# Altium PCB DB46.PcbDoc (part 3 of 6)
Units mm, origin at the board's own origin, x right, y up, seen from the top; angles counter-clockwise.
Board outline 82.2 x 113.2 mm, 8 copper layers (Top Layer, MidLayer1, MidLayer2, GND, MidLayer3, VCC, MidLayer4, Bottom Layer), stack 1.576 mm thick; 186 components, 477 nets, 1727 pads, 1538 vias.
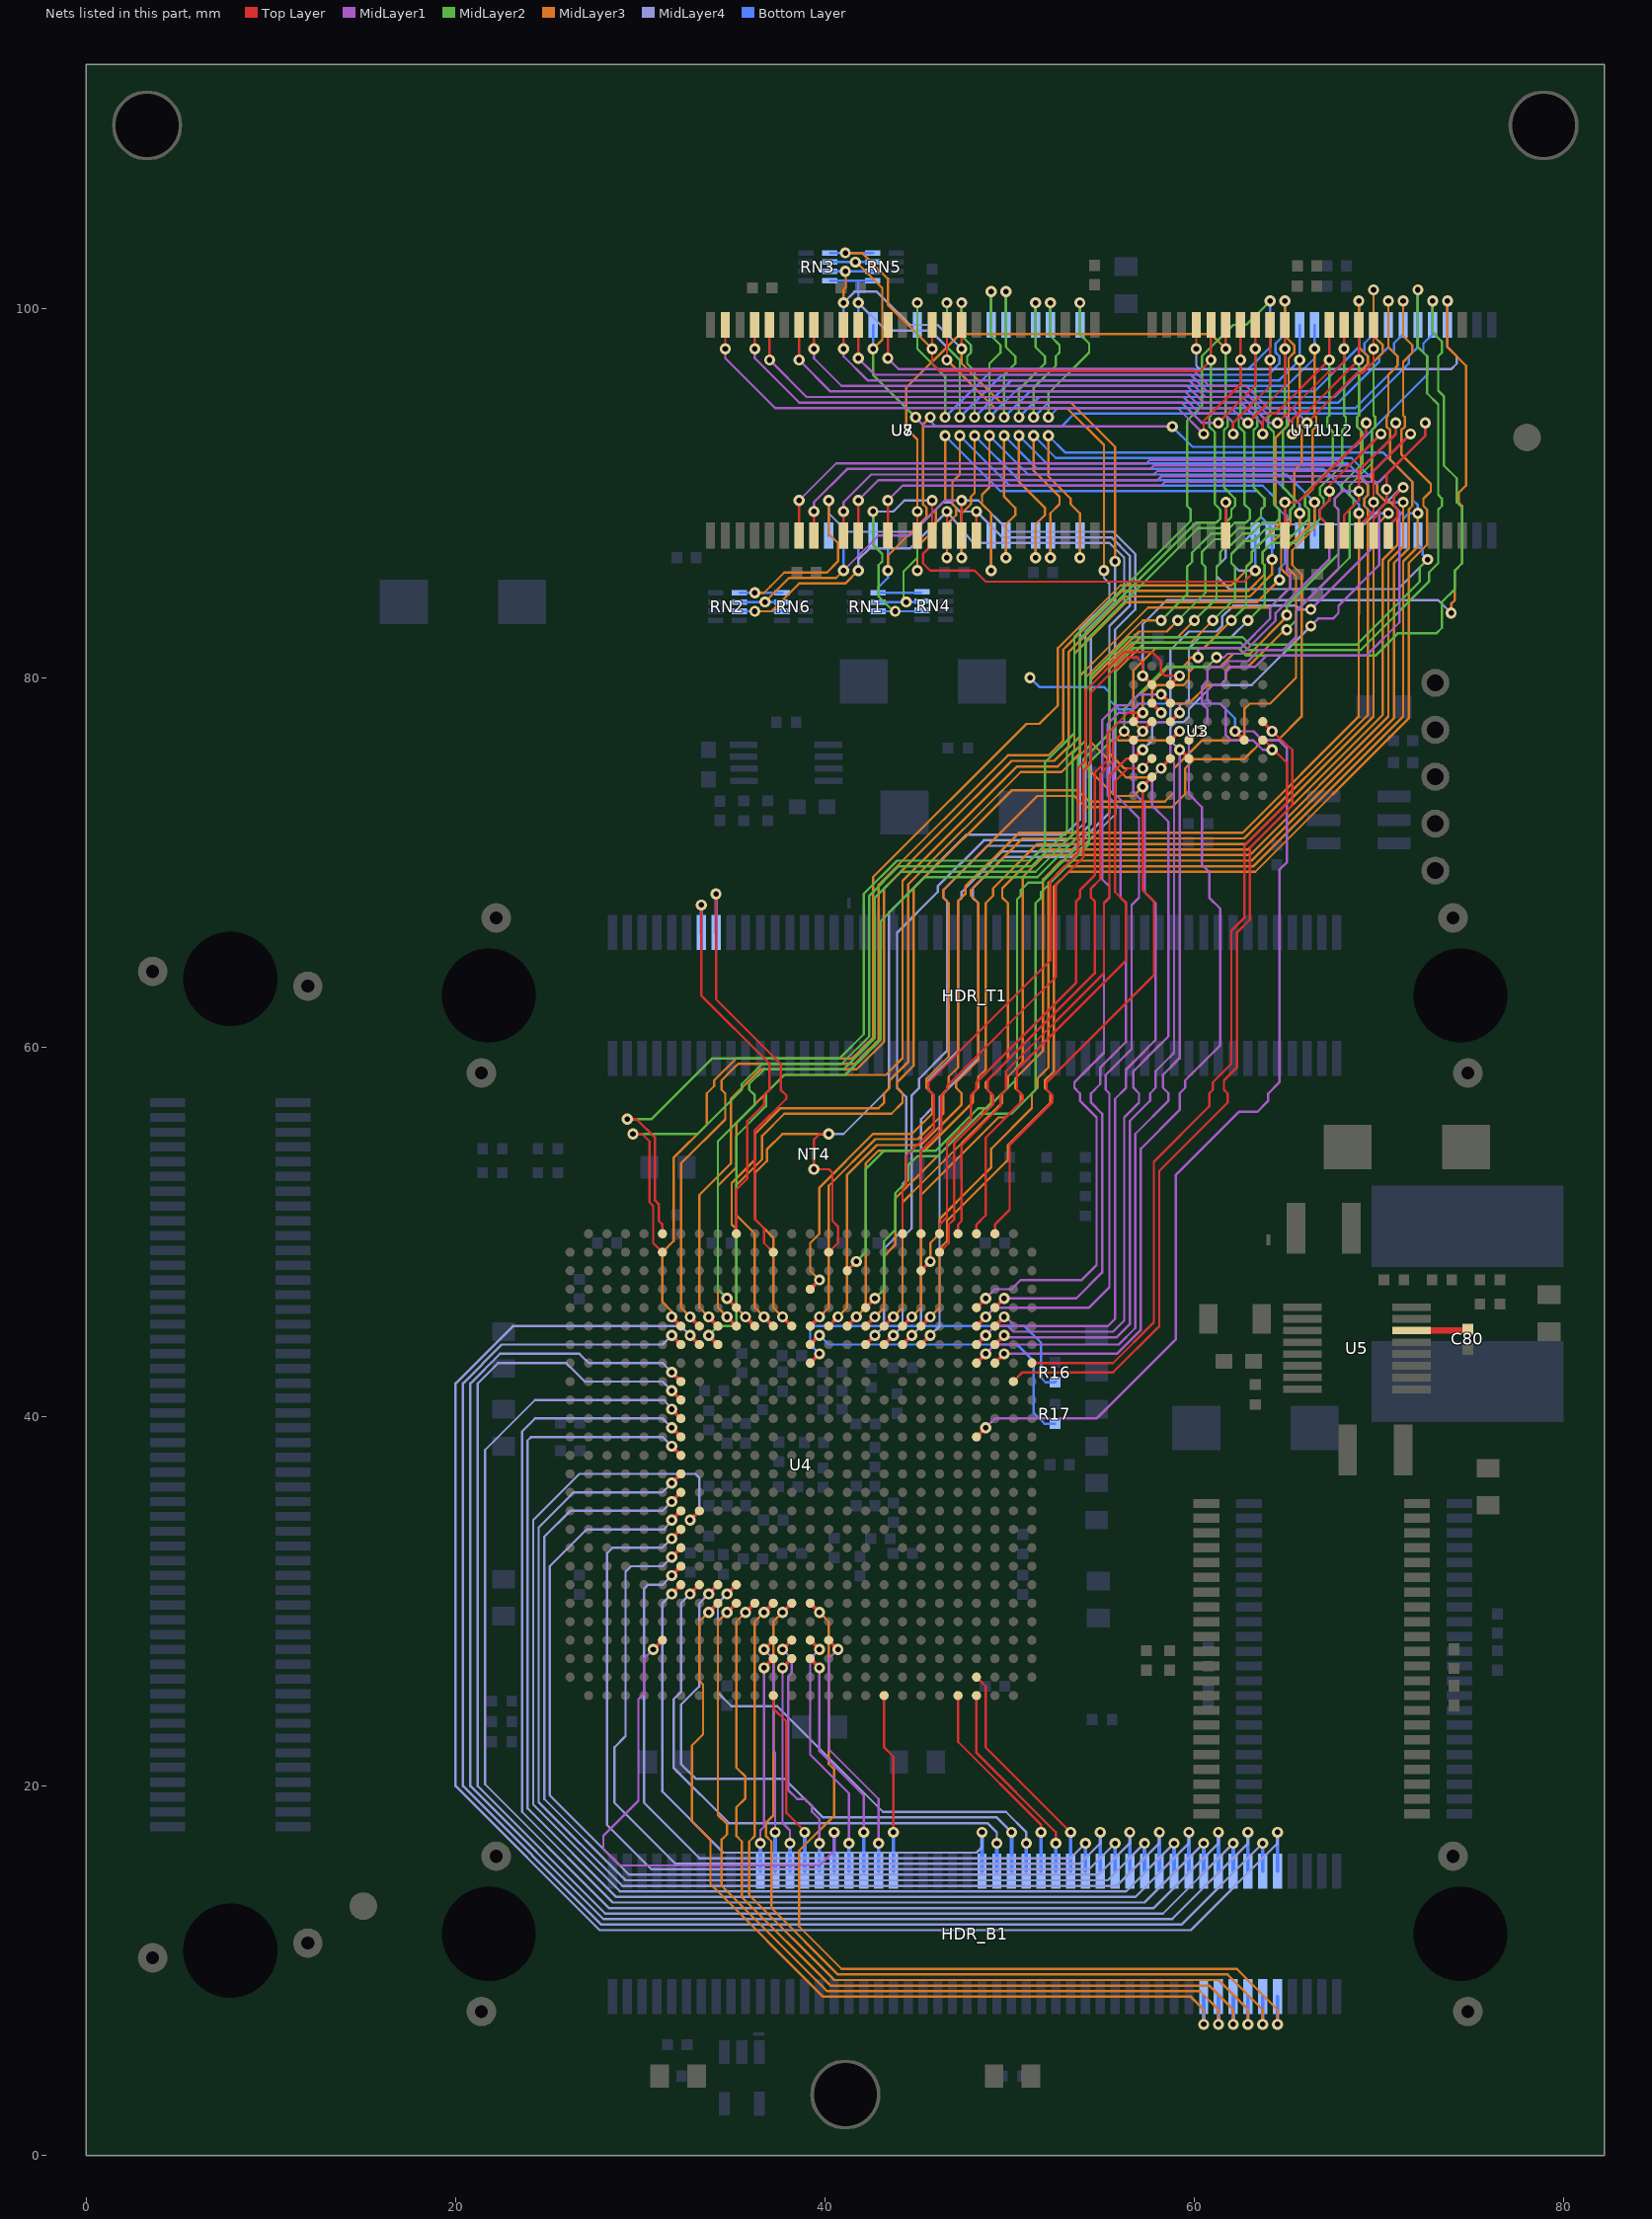
[diagram p9: the nets of this part, all layers, seen from the top]

## Via types
v1: diameter 0.6, hole 0.3, Top Layer to Bottom Layer, 904 vias
v2: diameter 0.6, hole 0.3, Top Layer to Bottom Layer, tented both sides, 506 vias
v3: diameter 0.7, hole 0.4, Top Layer to Bottom Layer, 127 vias
v4: diameter 0.6, hole 0.3, Top Layer to Bottom Layer, tented top, 1 vias

## Nets (pads, with @x,y where several pads share a name; then routed paths per layer and width w, separated by ;. In a path a pad name is that pad's centre, name@x,y a point inside that pad or via, vN(x,y) a via of type N, cw(c..) or ccw(c..) an arc to the next point about the centre after c; other vN are vias at no path point) (continued)
BUS_D3: U3.H4 U4.A21 U7.7 U11.10 | length 93.8
  Top Layer w0.127: U7.7@38.6,87.7 v2(38.6,89.6) ; U4.A21@46.2,49.9 46.2,50.4 46.6,50.8 46.6,51.5 46.6,51.8 46.6,54.8 47.9,56.1 47.9,57.4 48.2,57.7 48.2,58.1 53.6,63.5 53.6,67.9 53.8,68.1 53.8,68.5 54.6,69.3 54.6,74.859 55.3,75.559 55.3,77 56.4,78.1 v1(57.2,78.1) ; U11.10@64.9,87.7 v1(64.9,89.5) 65.6,89.5 69.3,93.2 v2(69.3,93.8)
  Top Layer w0.2: U3.H4@56.7,77.625 v1@57.187,78.112
  MidLayer1 w0.127: v2(38.6,89.6) 40.6,91.6 57.4,91.6 57.6,91.8 67.9,91.8 69.3,93.2 v2(69.3,93.8) ; v1(60.2,81.1) 60.2,81.5 60.3,81.6 62.5,81.6 64.1,83.2 64.1,83.8 65.2,84.9 65.2,85.6 65,85.8 65,88.8 64.9,88.9 v1(64.9,89.5)
  MidLayer3 w0.127: v1(57.2,78.1) 57.2,79.2 57.3,79.3 58.6,80.6 59.4,80.6 59.7,80.9 59.7,81 59.8,81.1 v1(60.2,81.1)
BUS_D4: U3.H5 U4.B21 U7.8 U11.13 | length 94.7
  Top Layer w0.127: U7.8@39.4,87.7 v2(39.4,89) ; U4.B21@46.2,48.9 46.7,49.4 ; 46.7,49.5 46.7,49.4 ; U3.H5@56.7,76.625 v1(56.2,77.1) 55.6,76.5 55.6,75.5 54.9,74.8 54.9,69.1 54.4,68.6 54.4,68.1 54.6,67.9 54.6,64 48.8,58.2 48.8,57.7 49.1,57.4 49.1,56.9 47,54.8 47,51.8 47,51.5 47,50.7 46.7,50.4 46.7,50.3 46.7,49.4 ; U11.13@67.3,87.7 67.3,88.2 66.8,88.7 66.8,89.1 67.3,89.6 v1(67.3,90.1) 67.3,90.4 v2(70.1,93.2)
  MidLayer1 w0.127: v2(39.4,89) 39.4,89.5 41.2,91.3 57.6,91.3 57.8,91.5 68.4,91.5 v2(70.1,93.2) ; v1(61.2,81.1) 61.6,81.1 61.8,81.3 62.6,81.3 64.4,83.1 64.4,83.5 67.3,86.4 67.3,88.2 66.8,88.7 66.8,89.1 67.3,89.6 v1(67.3,90.1)
  MidLayer2 w0.127: v1(56.2,77.1) 56.2,78.3 58.5,80.6 60.7,80.6 v1(61.2,81.1)
BUS_D5: U3.E5 U4.H24 U7.10 U11.14 | length 104.8
  Top Layer w0.127: U7.10@41,87.7 v2(41,89) ; U11.14@68.1,87.7 68.1,88.8 68.9,89.6 68.9,91.2 70.9,93.2 v2(70.9,93.8)
  Top Layer w0.2: U4.H24@49.2,42.9 v1(49.7,43.4) ; U3.E5@59.7,76.625 v1(60.2,77.1)
  MidLayer1 w0.127: v2(41,89) 41,89.5 42.5,91 57.8,91 58,91.2 68.9,91.2 70.9,93.2 v2(70.9,93.8) ; v1(49.7,43.4) 52.8,43.4 53.1,43.4 55.8,43.4 57.1,44.7 57.1,54.5 59.2,56.6 59.2,57.5 59.5,57.8 59.5,58.2 60,58.7 61.4,60.1 61.4,67.5 60.8,68.1 60.8,69.5 60.4,69.9 60.4,73 59.7,73.7 59.7,76.6 60.7,77.6 60.7,78.3 60.4,78.6 60.4,79.5 60.7,79.8 60.7,80.4 60.9,80.6 61.5,80.6 61.8,80.9 62.9,80.9 63.5,81.5 64.8,81.5 65.5,82.2 65.5,83.6 67.8,85.9 67.8,89.1 67.6,89.3 67.6,89.7 68,90.1 v1(68.9,90.1)
BUS_D6: U3.H6 U4.A22 U7.11 U11.15 | length 93
  Top Layer w0.127: U7.11@41.8,87.7 v2(41.8,89.6) ; U4.A22@47.2,49.9 47.2,50.4 47.4,50.6 47.4,51.5 47.4,51.8 47.4,54.7 49.5,56.8 49.5,57.4 49.8,57.7 49.8,58.7 55.1,64 55.1,67.8 55.4,68.1 55.4,74.7 56.325,75.625 U3.H6@56.7,75.625 ; U11.15@68.9,87.7 68.9,88.2 69.7,89 v1(69.7,89.5) 69.7,91.2 v2(71.7,93.2)
  Top Layer w0.2: U3.H6@56.7,75.625 57.187,76.112 v1@57.2,76.125
  MidLayer1 w0.127: v2(41.8,89.6) 42.9,90.7 58,90.7 58.2,90.9 69.4,90.9 v2(71.7,93.2) ; v1(66.3,83.7) 69.7,87.1 v1(69.7,89.5)
  MidLayer4 w0.127: v1(57.2,76.1) 57.7,76.6 57.7,77.3 58,77.6 58.5,77.6 58.7,77.8 58.7,81.5 59.7,82.5 61.2,82.5 61.5,82.8 61.5,83.3 62.1,83.9 65.5,83.9 65.7,83.7 v1(66.3,83.7)
BUS_D7: U3.E6 U4.H23 U7.13 U11.16 | length 104.7
  Top Layer w0.127: U7.13@43.4,87.7 v2(43.4,89.6) ; U11.16@69.7,87.7 69.7,88.6 70,88.9 70,89.1 70.4,89.5 70.4,91 72.5,93.1 v2(72.5,93.8)
  Top Layer w0.2: U4.H23@48.2,42.9 v1(48.7,43.4) ; v1@59.2,76.125 U3.E6@59.7,75.625
  MidLayer1 w0.127: v2(43.4,89.6) 44.2,90.4 58.2,90.4 58.4,90.6 70,90.6 72.5,93.1 v2(72.5,93.8) ; v1(48.7,43.4) 49.2,43.9 52.8,43.9 53.1,43.9 55.9,43.9 56.8,44.8 56.8,55.3 58.6,57.1 58.6,57.5 58.3,57.8 58.3,58.5 59.2,59.4 59.2,68.6 ; 59.2,68.1 v1(59.2,76.1) v1@59.2,76.125 ; v1(66.3,82.8) 66.7,83.2 67.5,83.2 67.8,83.5 67.8,83.9 70,86.1 70,89.1 70.4,89.5 v1(70.4,90.2)
  MidLayer4 w0.127: v1(59.2,76.1) 58.7,76.6 58.7,77.3 59,77.6 59.4,77.6 59.7,77.9 59.7,78.3 61,79.6 63.1,79.6 v1(66.3,82.8)
BUS_D8: U3.F3 U4.E23 U7.42 U11.29 | length 102.2
  Top Layer w0.127: v2(43.4,97.3) U7.42@43.4,99.1 ; v2(66.1,93.8) 68.787,96.487 69.087,96.487 69.7,97.1 v2(69.7,97.8) U11.29@69.7,99.1
  Top Layer w0.2: U4.E23@48.2,45.9 v1(48.7,46.4) ; v1@58.2,79.125 58.213,79.113 U3.F3@58.7,78.625
  MidLayer1 w0.127: v2(43.4,97.3) 44,96.7 59.9,96.7 60.8,95.8 62.8,95.8 64,94.6 65.3,94.6 v2(66.1,93.8) ; v1(48.7,46.4) 49.2,46.9 50.1,46.9 50.6,47.4 52.8,47.4 53.1,47.4 53.9,47.4 54.7,48.2 54.7,56.2 53.8,57.1 53.8,57.5 53.5,57.8 53.5,58.1 54.6,59.2 55.1,59.7 55.1,67.8 55.4,68.1 55.4,68.7 55,69.1 55,77.7 55.8,78.5 56.4,78.5 57,79.1 v1(58.2,79.1)
  MidLayer2 w0.127: v1(65,82.6) 65.5,83.1 65.5,83.6 68.4,86.5 68.4,89.1 68.6,89.3 68.6,89.7 68.4,89.9 68.4,90.4 69.6,91.6 69.6,93.4 69.8,93.6 69.8,94.1 69.7,94.2 v2(69.7,97.8)
  MidLayer3 w0.127: v1(58.2,79.1) 58.7,78.6 59.7,78.6 60.7,79.6 61.4,79.6 61.7,79.9 61.7,80.4 61.9,80.6 62.9,80.6 64.9,82.6 v1(65,82.6)
BUS_D9: U3.G3 U4.E24 U7.44 U11.30 | length 103.5
  Top Layer w0.127: v2(41.8,97.3) U7.44@41.8,99.1 ; v2(65.3,93.2) 65.3,94 65.7,94.4 66.1,94.4 v2(68.9,97.2) U11.30@68.9,99.1
  Top Layer w0.2: U4.E24@49.2,45.9 v1(49.7,46.4) ; U3.G3@57.7,78.625 v1(58.2,78.1)
  MidLayer1 w0.127: v2(41.8,97.3) 42.7,96.4 59.8,96.4 60.7,95.5 62.712,95.5 63.912,94.3 64.8,94.3 65.3,93.8 v2(65.3,93.2) ; v1(49.7,46.4) 52.8,46.4 53.1,46.4 53.6,46.4 55,47.8 55,56.4 54.4,57 54.4,57.5 54.9,58 54.9,58.9 56.3,60.3 56.3,67.8 56,68.1 56,72.9 55.6,73.3 55.3,73.6 55.3,77.5 55.9,78.1 56.5,78.1 57,78.6 57.7,78.6 v1(58.2,78.1)
  MidLayer2 w0.127: v1(65,83.4) 65,83.9 67.8,86.7 67.8,89.1 67.6,89.3 67.6,89.7 67.975,90.075 67.975,90.475 69.1,91.6 69.1,93.3 68.8,93.6 68.8,94.1 68.9,94.2 v2(68.9,97.2)
  MidLayer3 w0.127: v1(58.2,78.1) 57.7,78.6 57.7,79.3 58,79.6 59.4,79.6 59.7,79.9 59.7,80.3 60,80.6 61.4,80.6 62.1,81.3 63,81.3 65,83.3 v1(65,83.4)
BUS_D10: U3.F4 U4.F23 U7.45 U11.31 | length 103.7
  Top Layer w0.127: v2(41,97.8) U7.45@41,99.1 ; v2@64.45,93.85 64.55,93.85 67.225,96.525 67.525,96.525 68.1,97.1 U11.31@68.1,99.1
  Top Layer w0.2: U4.F23@48.2,44.9 v1(48.7,45.4) ; U3.F4@58.7,77.625 v1(59.2,78.1)
  MidLayer1 w0.127: v2(41,97.8) 41,97.4 42.3,96.1 59.7,96.1 60.6,95.2 62.6,95.2 64,93.8 v2(64.5,93.8) ; v1(48.7,45.4) 49.2,45.9 52.8,45.9 53.1,45.9 54.3,45.9 55.4,47 55.4,57.5 55.2,57.7 55.2,58.5 56.6,59.9 56.6,67.5 56.6,67.7 57,68.1 57,72.4 56,73.4 55.6,73.8 55.6,77.3 55.9,77.6 58.7,77.6 v1(59.2,78.1)
  MidLayer2 w0.127: v1(62.9,83.1) 63.8,84 63.8,86.1 63.7,86.2 63.7,86.8 64.2,87.3 65.5,87.3 66.8,88.6 66.8,89.1 67,89.3 67,89.7 66.8,89.9 66.8,90.3 68,91.5 68,93.4 68.2,93.6 68.2,94.1 68.1,94.2 v2(68.1,97.8)
  MidLayer4 w0.127: v1(59.2,78.1) 59.2,78.5 59.3,78.6 59.5,78.6 59.7,78.8 59.7,81.6 60.3,82.2 62,82.2 v1(62.9,83.1)
BUS_D11: U3.G4 U4.F24 U7.47 U11.32 | length 104.3
  Top Layer w0.127: v2(39.4,97.8) U7.47@39.4,99.1 ; v2(63.7,93.2) 63.7,93.9 64.1,94.3 64.4,94.3 v2(67.3,97.2) U11.32@67.3,99.1
  Top Layer w0.2: U4.F24@49.2,44.9 v1(49.7,45.4) ; v1(57.2,77.1) U3.G4@57.7,77.625
  MidLayer1 w0.127: v2(39.4,97.8) 39.4,97.3 40.9,95.8 59.6,95.8 60.5,94.9 62.5,94.9 63.7,93.7 v2(63.7,93.2) ; v1(49.7,45.4) 49.8,45.4 50.3,44.9 52.8,44.9 53.1,44.9 55.3,44.9 55.7,45.3 55.7,57.2 56.3,57.8 56.3,58.8 56.7,59.2 57.9,60.4 57.9,67.8 57.3,68.4 57.3,73.2 56.7,73.8 56.7,76.6 v1(57.2,77.1)
  MidLayer2 w0.127: v1(62,83.1) 62.8,83.9 62.8,86 63.1,86.3 63.1,86.8 64,87.7 65.3,87.7 66.2,88.6 66.2,89.1 66,89.3 66,90 67.5,91.5 67.5,93.3 67.2,93.6 67.2,94.1 67.3,94.2 v2(67.3,97.2)
  MidLayer3 w0.127: v1(57.2,77.1) 56.7,77.6 56.7,80.4 57.9,81.6 60.5,81.6 v1(62,83.1)
BUS_D12: U3.F5 U4.G24 U7.48 U11.35 | length 107.4
  Top Layer w0.127: v2(38.6,97.2) U7.48@38.6,99.1 ; v2(62.9,93.8) 64.9,95.8 v2(64.9,97.8) U11.35@64.9,99.1
  Top Layer w0.2: U4.G24@49.2,43.9 v1(49.7,44.4) ; U3.F5@58.7,76.625 v1(59.2,77.1)
  MidLayer1 w0.127: v2(38.6,97.2) 40.3,95.5 59.5,95.5 60.4,94.6 62,94.6 62.8,93.8 v2(62.9,93.8) ; v1(49.7,44.4) 49.8,44.3 52.8,44.3 53.1,44.3 55.8,44.3 56.5,45 56.5,56 57.6,57.1 57.6,57.5 57.9,57.8 57.9,58.7 58.7,59.5 58.9,59.7 58.9,75.4 58.7,75.6 58.7,76.6 v1(59.2,77.1) v1@59.1,77.2
  MidLayer2 w0.127: v1(61,83.1) 62.2,84.3 62.2,86 62,86.2 62,86.7 62.7,87.4 63.2,87.4 63.85,88.05 64.55,88.05 65.2,88.7 65.2,89.1 65.4,89.3 65.4,89.7 64.8,90.3 64.8,93.4 65,93.6 65,94.1 64.9,94.2 v2(64.9,97.8)
  MidLayer3 w0.127: v1(59.2,77.1) 58.7,76.6 55.9,76.6 55.7,76.8 55.7,80.3 57.3,81.9 59.8,81.9 v1(61,83.1)
  Bottom Layer w0.381: v1@49.7,44.292 v1(49.7,44.4)
BUS_D13: U3.G6 U4.A23 U7.50 U11.36 | length 96.5
  Top Layer w0.127: v2(37,97.2) U7.50@37,99.1 ; U4.A23@48.2,49.9 48.2,50.4 48.7,50.9 48.7,51.5 48.7,51.8 48.7,55.1 50.7,57.1 50.7,57.4 50.4,57.7 50.4,58.8 56.3,64.7 56.3,67.8 55.7,68.4 55.7,72.1 ; 55.7,71.7 55.7,74.4 56.4,75.1 v1(57.2,75.1) ; v1@57.2,75.125 U3.G6@57.7,75.625 ; v2(62.1,93.2) 62.1,93.8 64.1,95.8 v2(64.1,97.2) U11.36@64.1,99.1
  MidLayer1 w0.127: v2(37,97.2) 39,95.2 59.4,95.2 60.3,94.3 61.6,94.3 62.1,93.8 v2(62.1,93.2)
  MidLayer2 w0.127: v1(60,83.1) 61.2,84.3 61.2,86 61.4,86.2 61.4,86.8 61.8,87.2 62,87.2 62.6,87.8 63.1,87.8 63.7,88.4 64.1,88.4 64.4,88.4 64.6,88.6 64.6,89.1 64.3,89.4 64.3,93.3 64,93.6 64,94.1 64.1,94.2 v2(64.1,97.2)
  MidLayer3 w0.127: v1(57.2,75.1) 56.2,75.1 55.4,75.9 55.4,80.5 57.1,82.2 59.1,82.2 v1(60,83.1)
BUS_D14: U3.F6 U4.G23 U7.51 U11.37 | length 107.9
  Top Layer w0.127: v2(36.2,97.8) U7.51@36.2,99.1 ; v2(61.3,93.8) 63.3,95.8 v2(63.3,97.8) U11.37@63.3,99.1
  Top Layer w0.2: U4.G23@48.2,43.9 v1(48.7,44.4) ; v1@58.187,75.112 U3.F6@58.7,75.625
  MidLayer1 w0.127: v2(36.2,97.8) 36.2,97.3 38.6,94.9 59.3,94.9 60.4,93.8 v2(61.3,93.8) ; v1(48.7,44.4) 49.2,44.9 49.9,44.9 50.2,44.6 52.8,44.6 53.1,44.6 55.6,44.6 56.2,45.2 56.2,56.2 57,57 57,57.5 56.7,57.8 56.7,58.7 57.8,59.8 58.6,60.6 58.6,72.2 57.7,73.1 57.7,74.6 v1(58.2,75.1) v1@58.2,75.125
  MidLayer2 w0.127: v1(59.1,83.1) 60.6,84.6 60.6,86 60.4,86.2 60.4,86.8 61.1,87.5 61.8,87.5 62.4,88.1 63,88.1 63.6,88.7 63.6,89.1 63.8,89.3 63.8,89.7 63.2,90.3 63.2,93.4 63.4,93.6 63.4,94.1 63.3,94.2 v2(63.3,97.8)
  MidLayer3 w0.127: v1(58.2,75.1) 57.7,74.6 56.3,74.6 54.4,76.5 54.4,79.9 57,82.5 58.5,82.5 v1(59.1,83.1)
BUS_D15: U3.G7 U4.A24 U7.53 U11.38 | length 96.5
  Top Layer w0.127: v2(34.6,97.8) U7.53@34.6,99.1 ; U4.A24@49.2,49.9 49.2,50.4 50,51.2 50,51.5 50,51.8 50,54.7 52.3,57 52.3,57.4 52,57.7 52,58.1 57.8,63.9 57.8,67.9 57.2,68.5 57.2,71.606 ; 57.2,71.5 v1(57.2,74.1) v1@57.2,74.125 ; v2(60.5,93.2) 60.5,93.9 62.5,95.9 v2(62.5,97.2) U11.38@62.5,99.1
  Top Layer w0.2: v1@57.2,74.125 U3.G7@57.7,74.625
  MidLayer1 w0.127: v2(34.6,97.8) 34.6,97.3 37.3,94.6 59.1,94.6 v2(60.5,93.2)
  MidLayer2 w0.127: v1(58.2,83.1) 59.6,84.5 59.6,86 59.875,86.275 59.875,86.775 60.9,87.8 61.6,87.8 62.2,88.4 62.8,88.4 63,88.6 63,89.1 62.7,89.4 62.7,93.3 62.4,93.6 62.4,94.1 62.5,94.2 v2(62.5,97.2)
  MidLayer3 w0.127: v1(57.2,74.1) 56.7,73.6 55.7,73.6 54.1,75.2 54.1,80 57.2,83.1 v1(58.2,83.1)
BUS_D16: U4.C20 U8.2 U12.7 | length 91
  Top Layer w0.178: U4.C20@45.2,47.9 v1(45.7,48.4)
  MidLayer3 w0.127: v1(45.7,48.4) 45.7,49.4 46.2,49.9 46.2,50.7 48.1,52.6 49,53.5 49,54.5 51.2,56.7 51.2,57.5 51.5,57.8 51.5,58.3 52.1,58.9 52.1,68.9 53,69.8 63.2,69.8 71.3,77.9 71.3,86.3 72.1,87.1 v2(72.1,88.9) ; v2(52.1,93.1) 52.1,90.9 53.3,89.7 53.3,89.4 53.8,88.9 v2(53.8,86.5)
  Bottom Layer w0.127: v2(52.1,93.1) 53,92.2 70.2,92.2 71.8,90.6 71.8,89.65 72.1,89.35 v2(72.1,88.9) 71.6,88.9 71.3,88.6 U12.7@71.3,87.7 ; v2(53.8,86.5) U8.2@53.8,87.7
BUS_D17: U4.F18 U8.4 U12.8 | length 95.2
  Top Layer w0.2: U4.F18@43.2,44.9 v1(43.7,45.4)
  MidLayer3 w0.127: v1(43.7,45.4) 44.2,45.9 44.2,51.5 44.2,51.6 45.2,52.6 49.6,57 49.6,57.5 49.9,57.8 49.9,58.4 50.7,59.2 50.7,69.2 51.9,70.4 63,70.4 70.5,77.9 70.5,86.3 71.3,87.1 v2(71.3,89.5) ; v2(51.3,93.1) 51.3,91.2 52.7,89.8 52.7,89.4 52.2,88.9 v2(52.2,86.5)
  Bottom Layer w0.127: v2(51.3,93.1) 52.5,91.9 68.5,91.9 69.9,90.5 69.9,90 70.4,89.5 v2(71.3,89.5) 71.3,89 70.5,88.2 U12.8@70.5,87.7 ; v2(52.2,86.5) U8.4@52.2,87.7
BUS_D18: U4.F16 U8.5 U12.9 | length 96.7
  Top Layer w0.2: U4.F16@41.2,44.9 v1(41.7,45.4)
  MidLayer3 w0.127: v1(41.7,45.4) 42.2,45.9 42.2,51.5 42.2,51.8 42.2,53.7 42.9,54.4 45.4,54.4 48,57 48,57.5 48.3,57.8 48.3,58.4 48.7,58.8 48.7,67.8 49.1,68.2 49.1,68.6 51.5,71 62.8,71 69.7,77.9 69.7,88.1 v2(70.5,88.9) ; v2(50.5,93.1) 50.5,90.6 51.888,89.212 51.9,89.212 51.9,88.8 51.4,88.3 v2(51.4,86.5)
  Bottom Layer w0.127: v2(50.5,93.1) 52,91.6 68.3,91.6 69.4,90.5 69.4,89.9 69.2,89.7 69.2,89.3 69.6,88.9 69.7,88.9 ; v2(51.4,86.5) U8.5@51.4,87.7 ; U12.9@69.7,87.7 69.7,88.9 ; v2(70.5,88.9) 69.7,88.9
BUS_D19: U4.F14 U8.7 U12.10 | length 95.4
  Top Layer w0.2: U4.F14@39.2,44.9 v1(39.7,45.4)
  MidLayer3 w0.127: v1(39.7,45.4) 40.2,45.9 40.2,51.5 40.2,51.8 40.2,52.5 42.725,55.025 45.025,55.025 46.4,56.4 46.4,57.5 46.7,57.8 46.7,58.4 47.2,58.9 47.2,67.9 47.6,68.3 47.6,68.7 50.5,71.6 62.6,71.6 68.9,77.9 ; v2(49.7,93.1) 49.7,89.8 50.3,89.2 50.3,88.8 49.8,88.3 v2(49.8,86.5) ; 68.896,77.9 v2(68.9,88.9)
  Bottom Layer w0.127: v2(49.7,93.1) 51.5,91.3 67,91.3 68.9,89.4 v2(68.9,88.9) U12.10@68.9,87.7 ; v2(49.8,86.5) U8.7@49.8,87.7
BUS_D20: U4.D14 U8.8 U12.13 | length 94.1
  Top Layer w0.2: U4.D14@39.2,46.9 v1(39.7,47.4)
  MidLayer3 w0.127: v1(39.7,47.4) 39.2,47.9 39.2,49.4 39.7,49.9 39.7,51.5 39.7,51.8 39.7,52.4 42.6,55.3 44.7,55.3 45.8,56.4 45.8,57.5 45.5,57.8 45.5,58.3 46.7,59.5 46.7,67.8 46.4,68.1 46.4,68.5 51.5,73.6 53.5,73.6 54.1,73 58.8,73 59.5,73.7 59.5,75.1 60,75.6 62.7,75.6 63.7,76.6 64.5,76.6 65.8,77.9 65.8,85.6 65.3,86.1 65.3,86.9 66.5,88.1 v2(66.5,89.5) ; v2(48.9,93.1) 48.9,90.3 48.5,89.9 48.5,89.4 49,88.9 v2(49,85.8)
  Bottom Layer w0.127: v2(48.9,93.1) 51,91 65,91 v2(66.5,89.5) 66.5,88.9 U12.13@66.5,87.7 ; v2(49,85.8) U8.8@49,87.7
BUS_D21: U4.F11 U8.10 U12.14 | length 94.9
  Top Layer w0.2: v1(35.7,45.4) U4.F11@36.2,44.9
  MidLayer3 w0.127: v1(35.7,45.4) 35.2,45.9 35.2,50.142 34.946,50.396 34.946,52.646 36.2,53.9 36.2,55.3 37.6,56.7 42.9,56.7 43.2,57 43.2,57.5 43.5,57.8 43.5,58.2 44.5,59.2 44.5,68.8 50.6,74.9 52.8,74.9 53.8,75.9 53.8,80.1 54.5,80.8 57.5,83.8 64.1,83.8 65.2,84.9 65.2,85.4 64.7,85.9 64.7,87.1 65.7,88.1 v2(65.7,88.9) ; v2(47.4,86.5) 47.4,88.9 47.9,89.4 47.9,89.8 48.1,90 v2(48.1,93.1)
  Bottom Layer w0.127: v2(47.4,86.5) U8.10@47.4,87.7 ; v2(48.1,93.1) 50.5,90.7 64.4,90.7 65.7,89.4 v2(65.7,88.9) U12.14@65.7,87.7
BUS_D22: U4.F10 U8.11 U12.15 | length 93.6
  Top Layer w0.2: v1(34.7,45.4) U4.F10@35.2,44.9
  MidLayer3 w0.127: v1(34.7,45.4) 34.2,45.9 34.2,51.5 34.2,51.8 34.2,52.5 35.2,53.5 35.2,55.9 37.8,58.5 43.3,58.5 44.2,59.4 44.2,69 50.4,75.2 52.6,75.2 53.5,76.1 53.5,81.3 56.3,84.1 63.4,84.1 v1(64.6,85.3) ; v2(46.6,86.5) 46.6,88.3 47.1,88.8 47.1,89.2 46.9,89.4 46.9,90.6 47.3,91 v2(47.3,93.1)
  Bottom Layer w0.127: v2(46.6,86.5) U8.11@46.6,87.7 ; v2(47.3,93.1) 50,90.4 63.7,90.4 64.4,89.7 64.4,89.3 64.9,88.8 U12.15@64.9,87.7 64.9,86.8 64.9,86.2 64.6,85.9 v1(64.6,85.3)
BUS_D23: U4.F9 U8.13 U12.16 | length 95.6
  Top Layer w0.2: v1(33.7,45.4) U4.F9@34.2,44.9
  MidLayer3 w0.127: v1(33.7,45.4) 33.2,45.9 33.2,51.5 33.2,51.8 33.2,52 34.9,53.7 34.9,57.2 36.5,58.8 41.7,58.8 43.2,60.3 43.2,68.6 46.05,71.45 50.1,75.5 52.4,75.5 53.2,76.3 53.2,81.4 56.2,84.4 63,84.4 64.2,85.6 64.2,85.9 ; v2(45,85.8) 45,87.1 46,88.1 46,89.1 46.5,89.6 v2(46.5,93.1) ; 64.2,85.594 v2(64.2,86.4)
  Bottom Layer w0.127: v2(45,85.8) U8.13@45,87.7 ; v2(46.5,93.1) 49.5,90.1 63.4,90.1 63.8,89.7 63.8,89.3 63.6,89.1 63.6,88.7 64.1,88.2 U12.16@64.1,87.7 64.2,87.6 v2(64.2,86.4)
BUS_D24: U4.A6 U8.42 U12.29 | length 105.3
  Top Layer w0.127: v1(29.3,56.1) 29.8,56.1 30.8,55.1 30.8,51.7 31,51.5 31,50.6 31.2,50.4 ; U4.A6@31.2,49.9 31.2,50.4
  MidLayer2 w0.127: v1(29.3,56.1) 30.6,56.1 33.9,59.4 40.8,59.4 42.1,60.7 42.1,68.3 43.9,70.1 51.1,70.1 51.9,70.9 51.9,75.4 53.5,77 53.5,82.2 59.8,88.5 59.8,89.1 59.6,89.3 59.6,93.9 60.4,94.7 60.4,97.4 62.1,99.1 62.808,99.1 v2(64.1,100.391) ; v2(45,100.3) 45,97.8 46.5,96.3 v2(46.5,94.1)
  Bottom Layer w0.127: U8.42@45,99.1 v2(45,100.3) ; v2(46.5,94.1) 49.1,96.7 62.9,96.7 64.1,97.9 v2(64.1,100.391)
BUS_D25: U4.F7 U8.44 U12.30 | length 107.9
  Top Layer w0.2: v1(31.7,45.4) U4.F7@32.2,44.9
  MidLayer2 w0.127: v2(46.6,100.3) 46.6,97.9 47.3,97.2 v2(47.3,94.1)
  MidLayer3 w0.127: v1(31.7,45.4) 31.7,45.7 31.2,46.2 31.2,48.9 31.8,49.5 31.8,54 33.6,55.8 33.6,57.5 34,57.9 34,58.2 35.2,59.4 41.5,59.4 42.6,60.5 42.6,69.2 50.9,77.5 51.6,77.5 52.6,78.5 52.6,81.6 56,85 62,85 62.8,85.8 62.8,86 63.1,86.3 63.1,86.8 63.25,86.95 64.6,88.3 64.6,89.1 64.4,89.3 64.4,93 65.1,93.7 65.1,97.3 65.4,97.6 65.4,98 64.9,98.5 v2(64.9,100.4)
  Bottom Layer w0.127: U8.44@46.6,99.1 v2(46.6,100.3) ; v2(47.3,94.1) 49.6,96.4 64,96.4 64.6,97 64.6,97.4 64.4,97.6 64.4,98.1 64.9,98.6 v2(64.9,100.4)
BUS_D26: U4.F8 U8.45 U12.31 | length 104.6
  Top Layer w0.2: v1(32.7,45.4) U4.F8@33.2,44.9
  MidLayer2 w0.127: v2(47.4,100.3) 47.4,98.5 47.9,98 47.9,97.6 47.7,97.4 47.7,97 48.1,96.6 v2(48.1,94.1)
  MidLayer3 w0.127: v1(32.7,45.4) 32.2,45.9 32.2,51.5 32.2,51.8 32.2,53.7 34.6,56.1 34.6,57.5 34.4,57.7 34.4,58.2 35.3,59.1 41.6,59.1 42.9,60.4 42.9,68.8 49.9,75.8 52.1,75.8 52.9,76.6 52.9,81.525 53.075,81.7 56.075,84.7 62.9,84.7 63.8,85.6 63.8,86.1 63.7,86.2 63.7,86.8 65.2,88.3 65.2,89.1 65.4,89.3 65.4,91.2 65.8,91.6 65.8,93.4 65.6,93.6 65.6,94.1 65.7,94.2 v2(65.7,97.2)
  Bottom Layer w0.127: U8.45@47.4,99.1 v2(47.4,100.3) ; v2(48.1,94.1) 50.1,96.1 64.6,96.1 v2(65.7,97.2) U12.31@65.7,99.1
BUS_D27: U4.F12 U8.47 U12.32 | length 108.5
  Top Layer w0.2: v1(36.7,45.4) U4.F12@37.2,44.9
  MidLayer2 w0.127: v2(48.9,94.1) 48.9,97 49.5,97.6 49.5,98 49,98.5 v2(49,100.9)
  MidLayer3 w0.127: v1(36.7,45.4) 36.2,45.9 36.2,49.908 35.2,50.908 35.2,52.541 36.6,53.941 36.6,55.2 37.8,56.4 43.6,56.4 44.2,57 ; 44.1,56.9 44.2,57 ; v2(66.5,97.8) 66.5,94.2 66.6,94.1 66.6,93.6 66.4,93.4 66.4,90.2 66,89.8 66,89.3 66.2,89.1 66.2,88.2 65,87 65,86 65.5,85.5 65.5,80 64.1,78.6 63,78.6 62.7,78.3 62.7,76.9 62.4,76.6 60.4,76.6 58.9,75.1 58.9,73.8 58.4,73.3 54.3,73.3 53.7,73.9 50.1,73.9 44.8,68.6 44.8,59 43.9,58.1 43.9,57.8 44.2,57.5 44.2,57
  Bottom Layer w0.127: v2(48.9,94.1) 50.6,95.8 65,95.8 66.5,97.3 v2(66.5,97.8) U12.32@66.5,99.1 ; U8.47@49,99.1 v2(49,100.9)
BUS_D28: U4.F15 U8.48 U12.35 | length 109.9
  Top Layer w0.2: U4.F15@40.2,44.9 v1(40.7,45.4)
  MidLayer2 w0.127: v2(49.7,94.1) 49.7,96.4 50.3,97 50.3,97.4 49.8,97.9 v2(49.8,100.9)
  MidLayer3 w0.127: v1(40.7,45.4) 41.2,45.9 41.2,51.5 41.2,51.8 41.2,53.1 42.8,54.7 45.2,54.7 47.4,56.9 47.4,57.5 47.1,57.8 47.1,58.1 48.3,59.3 48.3,67.8 47.9,68.2 47.9,68.5 50.7,71.3 62.7,71.3 69.4,78 69.4,89.1 69.2,89.3 69.2,89.7 69.4,89.9 69.4,90.4 69,90.8 69,93.4 68.8,93.6 68.8,94.1 68.9,94.2 68.9,96.5 69.4,97 69.4,97.4 68.9,97.9 v2(68.9,100.4)
  Bottom Layer w0.127: v2(49.7,94.1) 51.1,95.5 66.5,95.5 68.9,97.9 68.9,99.1 v2(68.9,100.4) ; v2@49.7,100.9 v2(49.8,100.9) U8.48@49.8,99.1
BUS_D29: U4.F17 U8.50 U12.36 | length 108.9
  Top Layer w0.2: U4.F17@42.2,44.9 v1(42.7,45.4)
  MidLayer2 w0.127: v2(50.5,94.1) 50.5,95.6 51.9,97 51.9,97.4 51.4,97.9 v2(51.4,100.3)
  MidLayer3 w0.127: v1(42.7,45.4) 43.2,45.9 43.2,48.7 43.8,49.3 43.8,51.5 43.8,51.8 44.9,52.9 49,57 49,57.5 48.7,57.8 48.7,58.1 49.9,59.3 49.9,67.8 49.6,68.1 49.6,68.6 51.7,70.7 62.9,70.7 70.2,78 70.2,86.4 71,87.2 71,89.1 70.6,89.5 70.4,89.5 69.9,90 69.9,90.4 69.6,90.7 69.6,93.4 69.8,93.6 69.8,94.1 69.7,94.2 69.7,97.1 70.2,97.6 70.2,98 69.7,98.5 v2(69.7,101)
  Bottom Layer w0.127: v2(50.5,94.1) 51.6,95.2 67.6,95.2 69.4,97 69.4,97.4 69.2,97.6 69.2,98.1 69.7,98.6 69.7,99.1 v2(69.7,101) ; U8.50@51.4,99.1 v2(51.4,100.3)
BUS_D30: U4.F19 U8.51 U12.37 | length 106.1
  Top Layer w0.2: U4.F19@44.2,44.9 v1(44.7,45.4)
  MidLayer2 w0.127: v2(51.3,94.1) 51.3,95.7 52.5,96.9 52.5,97.4 52.7,97.6 52.7,98 52.2,98.5 v2(52.2,100.3)
  MidLayer3 w0.127: v1(44.7,45.4) 45.2,45.9 45.2,51.5 45.2,51.8 45.2,52 49.4,56.2 49.8,56.2 50.6,57 50.6,57.5 50.3,57.8 50.3,58.3 51.8,59.8 51.8,69.1 52.8,70.1 63.1,70.1 70.8,77.8 70.8,86.2 71.6,87 71.6,89.1 71.8,89.3 71.8,90.6 70.6,91.8 70.6,93.4 70.4,93.6 70.4,94.1 70.5,94.2 70.5,96.4 71,96.9 71,97.4 70.5,97.9 v2(70.5,100.4)
  Bottom Layer w0.127: v2(51.3,94.1) 52.1,94.9 67.8,94.9 70,97.1 70,97.4 70.5,97.9 70.5,99.1 v2(70.5,100.4) ; U8.51@52.2,99.1 v2(52.2,100.3)
BUS_D31: U4.F20 U8.53 U12.38 | length 106.8
  Top Layer w0.2: U4.F20@45.2,44.9 v1(45.7,45.4)
  MidLayer2 w0.127: v2(52.1,94.1) 52.1,95.4 54.3,97.6 54.3,98.1 53.8,98.6 v2(53.8,100.3)
  MidLayer3 w0.127: v1(45.7,45.4) 46.2,45.9 46.2,49.1 46.6,49.5 46.6,50.6 49.9,53.9 49.9,54.7 52.2,57 52.2,57.5 51.9,57.8 51.9,58.2 52.4,58.7 52.4,68.7 53.2,69.5 63.3,69.5 71.6,77.8 71.6,86.2 72.6,87.2 72.6,89.1 72.4,89.3 72.4,89.7 72.8,90.1 72.8,90.5 71.2,92.1 71.2,93.4 71.4,93.6 71.4,94.1 71.3,94.2 71.3,97.1 71.8,97.6 71.8,98 71.3,98.5 v2(71.3,100.4)
  Bottom Layer w0.127: v2(52.1,94.1) 52.6,94.6 68.7,94.6 71,96.9 71,97.4 70.8,97.6 70.8,98.1 71.3,98.6 v2(71.3,100.4) ; U8.53@53.8,99.1 v2(53.8,100.3)
BUS_FLASH_NBUSY: U3.A4 U4.J25 | length 45.7
  Top Layer w0.127: U4.J25@50.2,41.9 50.7,42.4 52.8,42.4 53.1,42.4 55.6,42.4 58.1,44.9 58.1,53.3 61.8,57 61.8,57.5 61.6,57.7 61.6,58.2 62.3,58.9 62.3,66.2 63,66.9 63,70.8 65.3,73.1 65.3,76.1 v1(64.2,77.1)
  Top Layer w0.2: U3.A4@63.7,77.625 v1(64.2,77.1)
BUS_FLASH_NCS: U3.F2 U4.A19 | length 41.3
  Top Layer w0.127: U4.A19@44.2,49.9 44.2,51.5 44.2,51.8 44.2,52.325 44.4,52.525 44.4,54.1 45.9,55.6 45.9,57.4 45.6,57.7 45.6,58.1 52.2,64.7 52.2,69 53.7,70.5 53.7,75.1 54.1,75.5 54.1,79.3 56.2,81.4 57.7,81.4 58.2,80.9 58.2,80.3 58.4,80.1 v1(59.2,80.1) ; U3.F2@58.675,79.625 U3.F2@58.7,79.625
  Top Layer w0.2: U3.F2@58.7,79.625 v1(59.2,80.1)
BUS_FLASH_NRESET: U3.B5 U4.M23 | length 65.1
  Top Layer w0.2: U4.M23@48.2,38.9 v1(48.7,39.4) ; v1(62.2,77.1) U3.B5@62.7,76.625
  MidLayer1 w0.127: v1(48.7,39.4) 49.2,39.9 52.8,39.9 53.1,39.9 54.7,39.9 59,44.2 59,53.1 62.4,56.5 63.4,56.5 64,57.1 64,57.5 64.6,58.1 64.6,69.6 65,70 65,76.2 64.6,76.6 63.7,76.6 63.2,77.1 v1(62.2,77.1)
  Bottom Layer w0.127: v1(51.1,80) 51.6,79.5 55.1,79.5 55.4,79.2 55.4,78.8 55.9,78.3 56.7,78.3 57,78.6 61.4,78.6 62.2,77.8 v1(62.2,77.1)
BUS_NBE0: RN1.6 RN4.7 U4.E10 U7.15 U11.39 | length 107.9
  Top Layer w0.127: U7.15@45,87.7 v2(45,89) ; v2(61.7,97.8) U11.39@61.7,99.1
  Top Layer w0.2: v1(34.7,46.4) U4.E10@35.2,45.9
  MidLayer2 w0.127: v1(34.7,46.4) 34.2,46.9 34.2,51.5 34.2,51.8 34.2,54.9 36.2,56.9 36.2,57.4 35.9,57.7 35.9,58 36.7,58.8 41,58.8 42.7,60.5 42.7,68.1 44.1,69.5 51.4,69.5 53.4,71.5 53.4,75.9 54.1,76.6 54.1,82 60.2,88.1 61.4,88.1 62,88.7 62,89.1 62.2,89.3 62.2,89.7 61.6,90.3 61.6,93.4 61.8,93.6 61.8,94.1 61.7,94.2 v2(61.7,97.8) ; v1@44.25,84.1 44.25,85.75 45,86.5 v2(45,89)
  MidLayer3 w0.127: v2(45,89) 45,92.9 44.4,93.5 44.4,95.7 47.3,98.6 60.9,98.6 v2(61.7,97.8)
  Bottom Layer w0.127: RN1.6@42.89,84.1 RN4.7@45.21,84.1
  other v1: 44.4,84.1
BUS_NBE1: RN3.5 RN5.8 U4.B6 U7.39 U11.40 | length 101.7
  Top Layer w0.127: v1(29.6,55.3) 30.1,55.3 30.5,54.9 30.5,51.6 30.7,51.4 30.7,49.4 U4.B6@31.2,48.9 ; U7.39@45.8,99.1 v2(45.8,97.8) 45.8,97 46.2,96.6 60.3,96.6 v2(60.9,97.2) U11.40@60.9,99.1
  MidLayer2 w0.127: v1(29.6,55.3) 33.1,55.3 35.5,57.7 35.5,58 36.6,59.1 40.9,59.1 42.4,60.6 42.4,68.2 44,69.8 51.2,69.8 53.1,71.7 53.1,76.1 53.8,76.8 53.8,82.1 60.1,88.4 61.2,88.4 61.4,88.6 61.4,89.1 61.1,89.4 61.1,93.3 60.8,93.6 60.8,94.1 60.9,94.2 v2(60.9,97.2)
  MidLayer3 w0.127: v1@41.095,103 42,103 43.4,101.6 43.4,100.2 v2@45.8,97.8
  Bottom Layer w0.127: RN3.5@40.29,103 RN5.8@42.6,103
  other v1: 41.1,103
BUS_NBE2: RN1.5 RN4.8 U4.C16 U8.15 U12.39 | length 123.8
  Top Layer w0.178: U4.C16@41.2,47.9 v1(41.7,48.4)
  MidLayer2 w0.127: v1(41.7,48.4) 42.2,48.9 42.2,51.5 42.2,51.8 42.2,53.4 43.2,54.4 46,54.4 46.2,54.6 48.3,56.7 48.8,56.7 50.4,58.3 50.4,68 50.6,68.2 50.6,68.5 51,68.9 51.7,68.9 54,71.2 54,75.6 55.4,77 55.4,80.7 56.6,81.9 62.5,81.9 62.9,81.5 69,81.5 72.7,85.2 72.7,85.7 73.2,86.2 73.2,89.1 73.4,89.3 73.4,89.7 73.2,89.9 73.2,94.8 72.6,95.4 72.6,97.4 72.1,97.9 v2(72.1,101)
  MidLayer3 w0.127: v2(43.4,85.8) 43.4,86.6 45.5,88.7 45.5,89.2 45.3,89.4 45.3,93.7 v2(45.7,94.1)
  Bottom Layer w0.127: U8.15@43.4,87.7 v2(43.4,85.8) 43.4,85.4 42.9,84.9 42.9,84.61 42.89,84.6 RN4.8@45.2,84.6 ; v2@45.7,93.9 46,93.6 52.8,93.6 53.5,94.3 68.9,94.3 71.6,97 71.6,97.4 72.1,97.9 72.1,99.1 v2(72.1,101)
BUS_NBE3: RN3.6 RN5.7 U4.E17 U8.39 U12.40 | length 127.8
  Top Layer w0.2: U4.E17@42.2,45.9 v1(42.7,46.4)
  MidLayer1 w0.127: v2(44.9,94.1) 45.4,93.6 v2(58.8,93.6)
  MidLayer2 w0.127: v2(42.6,97.8) 42.6,96.4 v2(44.9,94.1) ; v1(42.7,46.4) 43.2,46.9 43.2,49.5 43.8,50.1 43.8,51.5 43.8,51.8 43.8,52.1 44.5,52.8 44.5,53.6 45,54.1 46.1,54.1 47.2,55.2 48.4,56.4 50.1,56.4 51.4,57.7 51.4,67.8 51.7,68.1 51.7,68.4 54.3,71 54.3,75.4 55.7,76.8 55.7,80.6 56.7,81.6 62.4,81.6 62.8,81.2 69.8,81.2 71,82.4 73.1,82.4 73.4,82.7 73.4,84.1 74.1,84.8 74.1,85.8 74.5,86.2 74.5,89.2 74.2,89.5 74.2,90.8 73.5,91.5 73.5,95.25 73.2,95.55 73.2,97.4 73.4,97.6 73.4,98.2 72.9,98.7 v2(72.9,100.4)
  MidLayer3 w0.127: v1@41.695,102.5 43.1,101.095 43.1,98.3 v2(42.6,97.8)
  Bottom Layer w0.127: RN3.6@40.29,102.5 v1(41.65,102.5) RN5.7@42.575,102.5 RN5.7@42.61,102.5 ; v2(42.6,97.8) U8.39@42.6,99.1 ; v2(58.8,93.6) 59.9,92.5 68.7,92.5 72.6,96.4 72.6,97.4 72.4,97.6 72.4,98.1 72.9,98.6 72.9,99.1 v2(72.9,100.4)
BUS_NOE: U3.G2 U4.A20 U11.41 U12.41 | length 97.9
  Top Layer w0.127: U4.A20@45.2,49.9 45.2,51.5 45.2,51.8 45.2,54.4 46.3,55.5 46.3,57.4 46.6,57.7 46.6,57.9 52.5,63.8 52.5,68.8 54,70.3 54,75 54.4,75.4 54.4,79.2 56.3,81.1 56.9,81.1 57.2,80.8 v1@57.2,80.125 ; v1@57.3,80.025 57.3,80.1 v1@57.3,80.125 ; v2(60.1,97.8) U11.41@60.1,99.1
  Top Layer w0.2: v1@57.2,80.125 57.213,80.113 57.3,80.025 U3.G2@57.7,79.625
  MidLayer3 w0.127: v2(73.7,100.4) 73.7,97.9 74.7,96.9 74.7,90.4 74.3,90 74.3,89.5 74.5,89.3 74.5,86.2 74.1,85.8 74.1,84.2 73.9,84 v1(73.9,83.5)
  MidLayer4 w0.127: v1(57.2,80.1) 57.2,82.9 58.5,84.2 73.2,84.2 v1(73.9,83.5) ; v2(60.1,97.8) 60.1,96.9 60.3,96.7 73.9,96.7 74.2,97 74.2,97.4 73.7,97.9 v2(73.7,100.4)
  Bottom Layer w0.127: U12.41@73.7,99.1 v2(73.7,100.4)
BUS_NWE: RN1.7 RN4.6 U3.A5 U4.H26 U7.16 U8.16 U11.17 U12.17 | length 121.6
  Top Layer w0.127: U7.16@45.8,87.7 v2(45.8,89.6) ; U7.16@45.8,87.9 45.8,87.2 45.3,86.7 45.3,86.2 45.7,85.8 48.1,85.8 48.7,85.2 62.7,85.2 v1(63.3,85.8) ; U4.H26@51.2,42.9 52.8,42.9 53.1,42.9 55.6,42.9 57.8,45.1 57.8,53.8 60.8,56.8 60.8,57.5 61,57.7 61,58.1 62,59.1 62,66.3 62.7,67 62.7,70.9 65,73.2 65,75.4 63.775,76.625 U3.A5@63.7,76.625 ; U11.17@70.5,87.7 70.5,88.2 71,88.7 71,89.1 70.8,89.3 70.8,89.8 v1(71.3,90.3)
  MidLayer1 w0.127: v1(64.2,76.1) 63.7,76.1 63.2,76.6 62,76.6 61.7,76.9 61.7,78.3 61.4,78.6 60.9,78.6 60.7,78.8 60.7,79.3 61,79.6 61.4,79.6 61.7,79.9 61.7,80.3 62,80.6 63.3,80.6 63.9,81.2 69.3,81.2 71.1,83 71.1,89 70.8,89.3 70.8,89.8 v1(71.3,90.3)
  MidLayer2 w0.127: v2(42.6,89) 42.6,87.2 43.1,86.7 43.1,86.3 42.9,86.1 42.9,84.4 v1@43.7,83.6
  MidLayer4 w0.127: v2(42.6,89) 43.7,89 44.3,89.6 v2(45.8,89.6) ; v1(63.3,85.8) 62.4,85.8 62,86.2 62,86.7 63.6,88.3 69.2,88.3 v1@71.25,90.35
  Bottom Layer w0.127: U8.16@42.6,87.7 v2(42.6,89) ; RN1.7@42.88,83.6 45.2,83.6 RN4.6@45.21,83.6 ; v1(63.3,85.8) U12.17@63.3,87.7
  other v1: 43.8,83.6
BUS_SDRAM_CKE: RN3.7 RN5.6 U4.G17 U7.37 U8.37 | length 83.5
  Top Layer w0.127: v2(47.4,97.8) U7.37@47.4,99.1
  Top Layer w0.2: U4.G17@42.2,43.9 v1(42.7,44.4)
  MidLayer3 w0.127: v2(41,100.3) 41,101 41.12,101.12 v1@41.12,102 ; v2(47.4,97.8) 47.4,97 49.5,94.9 53.3,94.9 55.7,92.5 v1(55.7,86.3)
  MidLayer4 w0.127: v2(41,100.3) 41.6,100.9 42.8,100.9 44.6,99.1 46.1,99.1 v2(47.4,97.8) ; v1(42.7,44.4) 43.2,44.9 43.2,49.1 44.2,50.1 44.2,51.5 44.2,51.8 44.2,52.6 44.4,52.8 44.4,57.3 43.9,57.8 43.9,66.2 46.1,68.4 46.1,68.7 48.6,71.2 53.1,71.2 54.1,72.2 54.1,82.5 55.7,84.1 v1(55.7,86.3)
  Bottom Layer w0.127: U8.37@41,99.1 v2(41,100.3) ; v1@41.075,102 40.29,102 RN5.6@42.575,102 RN5.6@42.61,102
  other v1: 41.1,102
BUS_SDRAM_CLK: NT4.2 RN3.8 RN5.5 U4.F13 U7.38 U8.38 | length 86.7
  Top Layer w0.127: NT4.2@39.4,54.471 39.4,55 39.7,55.3 v1(40.2,55.3) ; v2(46.6,97.2) U7.38@46.6,99.1
  Top Layer w0.2: v1(37.7,45.4) U4.F13@38.2,44.9
  MidLayer3 w0.127: v1(37.7,45.4) 37.2,45.9 37.2,49.699 36.195,50.703 36.195,53.177 36.854,53.835 36.854,54.456 37.698,55.3 v1(40.2,55.3) ; v2(46.6,97.2) 49.2,94.6 53.1,94.6 55.1,92.6 v1(55.1,85.8)
  MidLayer4 w0.127: v1(40.2,55.3) 41,55.3 43.459,57.76 43.459,67.309 47.65,71.5 53,71.5 53.8,72.3 53.8,82.6 55.4,84.2 55.4,85.1 55.1,85.4 v1(55.1,85.8) ; v2(41.8,100.3) 43.3,98.8 45.7,98.8 46.6,97.9 v2(46.6,97.2)
  Bottom Layer w0.127: RN3.8@40.29,101.5 RN5.5@42.575,101.5 RN5.5@42.61,101.5 ; U8.38@41.8,99.1 41.8,101.5
BUS_SDRAM_FEEDBACK: NT4.1 U4.B15 | length 6.3
  Top Layer w0.127: NT4.1@39.395,53.962 v1(39.395,53.391) 40.208,53.391 40.4,53.199 40.4,51.8 40.4,51.5 40.4,50.6 40.7,50.3 40.7,49.4 U4.B15@40.2,48.9
BUS_SDRAM_NCAS: RN2.7 RN6.6 U4.G18 U7.17 U8.17 | length 80
  Top Layer w0.127: U7.17@46.6,87.7 46.6,88.9 v1(46.6,89)
  Top Layer w0.2: U4.G18@43.2,43.9 v1(43.7,44.4)
  MidLayer3 w0.127: v1@36.175,83.6 37.1,83.6 38.6,85.1 41.1,85.1 v2(41.8,85.8)
  MidLayer4 w0.127: v2(41.8,85.8) 41.8,86.4 42.4,87 44.6,87 v1(46.6,89) 48.017,87.3 55.4,87.3 56.2,86.5 56.2,84.1 54.4,82.3 54.4,72.1 53.2,70.9 48.8,70.9 46.4,68.5 46.4,68.1 46.6,67.9 46.6,59.8 45.1,58.3 45.1,57.8 44.7,57.4 44.7,51.8 44.7,51.5 44.7,50.2 44.2,49.7 44.2,44.9 v1(43.7,44.4)
  Bottom Layer w0.127: RN2.7@35.39,83.6 36.175,83.6 RN6.6@37.675,83.6 RN6.6@37.71,83.6 ; v2(41.8,85.8) U8.17@41.8,87.7
  other v1: 36.2,83.6
BUS_SDRAM_NCS: RN2.5 RN6.8 U4.G19 U7.19 U8.19 | length 84.5
  Top Layer w0.127: U7.19@48.2,87.7 v2(48.2,89)
  Top Layer w0.2: U4.G19@44.2,43.9 v1(44.7,44.4)
  MidLayer3 w0.127: v1(36.2,84.6) 36.7,84.6 37.047,84.947 37.8,85.7 40.1,85.7 40.7,86.3 40.7,87.3 40.2,87.8 v2(40.2,89.6)
  MidLayer4 w0.127: v2(40.2,89.6) 40.2,88.9 41.2,87.9 44.8,87.9 46.4,89.5 46.8,89.5 47.3,89 v2(48.2,89) 49.6,87.6 55.5,87.6 56.5,86.6 56.5,83.9 55.4,82.8 55.4,72.7 53.3,70.6 49.6,70.6 47.4,68.4 47.4,68.1 47.2,67.9 47.2,59.8 45.5,58.1 45.5,57.8 45.8,57.5 45.8,56.7 45.2,56.1 45.2,51.8 45.2,51.5 45.2,44.9 v1(44.7,44.4)
  Bottom Layer w0.127: v1(36.2,84.6) 35.39,84.6 RN6.8@37.675,84.6 RN6.8@37.7,84.6 ; U8.19@40.2,87.7 v2(40.2,89.6)
BUS_SDRAM_NRAS: RN2.6 RN6.7 U4.G20 U7.18 U8.18 | length 79.9
  Top Layer w0.127: U7.18@47.4,87.7 v1(47.4,89.6)
  Top Layer w0.2: U4.G20@45.2,43.9 v1(45.7,44.4)
  MidLayer1 w0.127: v2(41,85.8) 42.9,87.7 44.6,87.7 46.5,89.6 v1(47.4,89.6)
  MidLayer3 w0.127: v1(36.75,84.1) 38.05,85.4 40.6,85.4 v2(41,85.8)
  MidLayer4 w0.127: v1(45.7,44.4) 46.2,44.9 46.2,51.5 46.2,51.8 46.2,57.3 48.3,59.4 48.3,67.8 48,68.1 48,68.6 49.7,70.3 53.4,70.3 55.7,72.6 55.7,82.6 56.8,83.7 56.8,86.7 55.6,87.9 50,87.9 48.3,89.6 v1(47.4,89.6) v1@47.2,89.7
  Bottom Layer w0.127: RN2.6@35.39,84.1 v1(36.75,84.1) RN6.7@37.675,84.1 RN6.7@37.71,84.1 ; v2(41,85.8) U8.18@41,87.7
BUS_SRAM_NCS: U4.G9 U11.6 U12.6 | length 92.6
  Top Layer w0.127: U11.6@61.7,87.7 61.7,89 v2(61.7,89.5)
  Top Layer w0.2: v1(33.7,44.4) U4.G9@34.2,43.9
  MidLayer2 w0.127: v1(33.7,44.4) 34.2,44.9 35.1,44.9 35.2,45 35.2,51.5 35.2,51.8 35.2,55.2 36.8,56.8 36.8,57.5 37.8,58.5 41.1,58.5 43,60.4 43,66.8 45.4,69.2 51.5,69.2 53.7,71.4 53.7,75.7 54.4,76.4 54.4,80.125 56.475,82.2 62.6,82.2 63,81.8 68.8,81.8 72.2,85.2 72.2,85.975 v2(72.625,86.4)
  MidLayer4 w0.127: v2(61.7,89.5) 61.7,86.5 61.2,86 61.2,85.5 61.9,84.8 71.025,84.8 v2(72.625,86.4)
  Bottom Layer w0.127: U12.6@72.1,87.7 72.1,87.209 72.363,86.946 72.363,86.663 v2(72.625,86.4)
BUZZER: HDR_B1.40 U4.AF18 | length 9.7
  Top Layer w0.127: U4.AF18@43.2,24.9 43.2,23.3 43.2,23 43.2,22.1 43.7,21.6 v2(43.7,17.5)
  Bottom Layer w0.2: HDR_B1.40@43.7,15.4 v2(43.7,17.5)
CAN_RXD: HDR_T1.14 U4.A10 | length 21.6
  Top Layer w0.127: v2(33.3,67.7) 33.3,62.8 37,59.1 37,57.7 36.7,57.4 36.7,56.9 35.8,56 35.8,52.9 35.2,52.3 35.2,51.8 35.2,51.5 U4.A10@35.2,49.9
  Bottom Layer w0.2: HDR_T1.14@33.3,66.2 v2(33.3,67.7)
CAN_TXD: HDR_T1.16 U4.B12 | length 24.2
  Top Layer w0.127: v2(34.1,68.3) 34.1,62.6 37.6,59.1 37.6,57.7 37.9,57.4 37.9,57.2 36.2,55.5 36.2,51.8 36.2,51.5 36.2,50.7 36.7,50.2 36.7,49.4 U4.B12@37.2,48.9
  Bottom Layer w0.2: HDR_T1.16@34.1,66.2 v2(34.1,68.3)
CCLK: R17.2 U4.G14 | length 17.1
  Top Layer w0.2: U4.G14@39.2,43.9 39.687,44.412 v1@39.7,44.425
  Bottom Layer w0.127: v1(39.7,44.4) 40.2,43.9 50.4,43.9 51.3,43 51.3,40.2 51.888,39.612 R17.2@52.451,39.612
COMP: C80.2 U5.6 | length 3.1
  Top Layer w0.35: U5.6@71.744,44.659 74.734,44.659 C80.2@74.8,44.725
DAU_RESET_SW: HDR_B1.38 U4.AC15 | length 14
  Top Layer w0.2: U4.AC15@40.2,27.9 v1(40.7,27.4)
  MidLayer1 w0.127: v1(40.7,27.4) 40.2,26.9 40.2,23.3 40.2,23 40.2,22 42.9,19.3 v2(42.9,16.9)
  Bottom Layer w0.2: HDR_B1.38@42.9,15.4 v2(42.9,16.9)
DAU_TFT_BLIGHT: HDR_B1.91 U4.AA14 | length 48.9
  Top Layer w0.2: U4.AA14@39.2,29.9 v1(39.7,29.4)
  MidLayer3 w0.127: v1(39.7,29.4) 40.2,28.9 40.2,23.3 40.2,23 40.2,21.2 40.5,20.9 40.5,18.4 38.6,16.5 38.6,12.4 40.9,10.1 62.3,10.1 64.5,7.9 v2(64.5,7.1)
  Bottom Layer w0.2: v2(64.5,7.1) HDR_B1.91@64.5,8.6
DAU_TFT_BLUE0: HDR_B1.62 U4.AF23 | length 11.3
  Top Layer w0.127: U4.AF23@48.2,24.9 48.2,23.3 48.2,23 48.2,21.8 52.5,17.5 v2(52.5,16.9)
  Bottom Layer w0.2: HDR_B1.62@52.5,15.4 v2(52.5,16.9)
DAU_TFT_BLUE1: HDR_B1.64 U4.AE23 | length 12.6
  Top Layer w0.127: U4.AE23@48.2,25.9 48.7,25.4 48.7,23.3 48.7,23 48.7,22.1 v2@53.3,17.5
  Bottom Layer w0.2: HDR_B1.64@53.3,15.4 v2(53.3,17.5)
DAU_TFT_BLUE2: HDR_B1.66 U4.W7 | length 41.1
  Top Layer w0.2: v1(31.7,31.4) U4.W7@32.2,31.9
  MidLayer4 w0.127: v1(31.7,31.4) 31.2,30.9 30.4,30.9 30.2,30.7 30.2,23.3 30.2,23 30.2,19.1 33.2,16.1 53.3,16.1 v2(54.1,16.9)
  Bottom Layer w0.2: HDR_B1.66@54.1,15.4 v2(54.1,16.9)
DAU_TFT_BLUE3: HDR_B1.68 U4.V7 | length 47.1
  Top Layer w0.2: v1(31.7,32.4) U4.V7@32.2,32.9
  MidLayer4 w0.127: v1(31.7,32.4) 31.2,31.9 29.5,31.9 29.2,31.6 29.2,23.3 29.2,23 29.2,22.7 28.6,22.1 28.6,19.1 31.9,15.8 53.8,15.8 54.9,16.9 v2(54.9,17.5)
  Bottom Layer w0.2: HDR_B1.68@54.9,15.4 v2(54.9,17.5)
DAU_TFT_BLUE4: HDR_B1.70 U4.U7 | length 49.8
  Top Layer w0.2: v1(31.7,33.4) U4.U7@32.2,33.9
  MidLayer4 w0.127: v1(31.7,33.4) 31.2,32.9 28.5,32.9 28.2,32.6 28.2,23.3 28.2,23 28.2,17.9 30.6,15.5 54.3,15.5 v2(55.7,16.9)
  Bottom Layer w0.2: HDR_B1.70@55.7,15.4 v2(55.7,16.9)
DAU_TFT_CL1: HDR_B1.88 U4.J7 | length 84
  Top Layer w0.2: v1(31.7,42.4) U4.J7@32.2,41.9
  MidLayer4 w0.127: v1(31.7,42.4) 31.2,42.9 27.2,42.9 26.7,43.4 24.6,43.4 24.3,43.4 22.4,43.4 20.8,41.8 20.8,20 28,12.8 58.8,12.8 62.9,16.9 v2(62.9,17.5)
  Bottom Layer w0.2: HDR_B1.88@62.9,15.4 v2(62.9,17.5)
DAU_TFT_CL2: HDR_B1.90 U4.G7 | length 86.1
  Top Layer w0.2: v1(31.7,44.4) U4.G7@32.2,43.9
  MidLayer4 w0.127: v1(31.7,44.4) 31.2,43.9 24.6,43.9 24.3,43.9 22.5,43.9 20.4,41.8 20.4,20 27.9,12.5 59.3,12.5 v2(63.7,16.9)
  Bottom Layer w0.2: v2(63.7,16.9) HDR_B1.90@63.7,15.4 v2(63.7,16.9)
DAU_TFT_CL3: HDR_B1.92 U4.G8 | length 89.1
  Top Layer w0.2: v1(32.7,44.4) U4.G8@33.2,43.9
  MidLayer4 w0.127: v1(32.7,44.4) 32.2,44.9 24.6,44.9 24.3,44.9 23.1,44.9 20,41.8 20,20 27.8,12.2 59.8,12.2 64.5,16.9 v2(64.5,17.5)
  Bottom Layer w0.2: HDR_B1.92@64.5,15.4 v2(64.5,17.5)
DAU_TFT_DISP_ON: HDR_B1.89 U4.AA13 | length 48.4
  Top Layer w0.2: v1(37.7,29.4) U4.AA13@38.2,29.9
  MidLayer3 w0.127: v1(37.7,29.4) 37.2,28.9 37.2,23.3 37.2,23 37.2,18.4 36.8,18 36.8,17.3 37.1,17 37.1,13.4 40.7,9.8 61.8,9.8 63.7,7.9 v2(63.7,7.1)
  Bottom Layer w0.2: v2(63.7,7.1) HDR_B1.89@63.7,8.6
DAU_TFT_GREEN0: HDR_B1.72 U4.T7 | length 57.4
  Top Layer w0.2: v1(31.7,34.4) U4.T7@32.2,34.9
  MidLayer4 w0.127: v1(31.7,34.4) 31.3,33.9 27.4,33.9 27.1,33.9 25.1,31.9 25.1,19.5 29.4,15.2 54.8,15.2 56.5,16.9 v2(56.5,17.5)
  Bottom Layer w0.2: HDR_B1.72@56.5,15.4 v2(56.5,17.5)
DAU_TFT_GREEN1: HDR_B1.74 U4.R7 | length 59.2
  Top Layer w0.2: v1(31.7,35.4) U4.R7@32.2,35.9
  MidLayer4 w0.127: v1(31.7,35.4) 31.2,34.9 26.2,34.9 24.8,33.5 24.8,19.3 29.2,14.9 55.3,14.9 v2(57.3,16.9)
  Bottom Layer w0.2: HDR_B1.74@57.3,15.4 v2(57.3,16.9)
DAU_TFT_GREEN2: HDR_B1.76 U4.P7 | length 62.9
  Top Layer w0.2: v1(31.7,36.4) U4.P7@32.2,36.9
  MidLayer4 w0.127: v1(31.7,36.4) 31.2,35.9 26.4,35.9 24.5,34 24.5,19.125 24.504,19.121 29.025,14.6 55.8,14.6 58.1,16.9 v2(58.1,17.5)
  Bottom Layer w0.2: HDR_B1.76@58.1,15.4 v2(58.1,17.5)
DAU_TFT_GREEN3: HDR_B1.78 U4.T8 | length 68
  Top Layer w0.2: v1(32.7,34.4) U4.T8@33.2,34.9
  MidLayer4 w0.127: 28.9,14.3 56.3,14.3 v2(58.9,16.9) ; 28.9,14.304 24.2,19.004 24.2,34.4 26.7,36.9 33,36.9 33.2,36.7 33.2,34.9 v1(32.7,34.4)
  Bottom Layer w0.2: HDR_B1.78@58.9,15.4 v2(58.9,16.9)
DAU_TFT_GREEN4: HDR_B1.80 U4.N7 | length 70.4
  Top Layer w0.2: v1(31.7,38.4) U4.N7@32.2,37.9
  MidLayer4 w0.127: v1(31.7,38.4) 31.2,38.9 26.3,38.9 24.1,38.9 23.9,38.7 23.9,18.8 28.7,14 56.8,14 59.7,16.9 v2(59.7,17.5)
  Bottom Layer w0.2: HDR_B1.80@59.7,15.4 v2(59.7,17.5)
DAU_TFT_GREEN5: HDR_B1.82 U4.M7 | length 71.7
  Top Layer w0.2: v1(31.7,39.4) U4.M7@32.2,38.9
  MidLayer4 w0.127: v1(31.7,39.4) 31.2,39.9 24.3,39.9 23.6,39.2 23.6,18.6 28.5,13.7 57.3,13.7 v2(60.5,16.9)
  Bottom Layer w0.2: HDR_B1.82@60.5,15.4 v2(60.5,16.9)
DAU_TFT_IRQ: HDR_B1.81 U4.AA9 | length 48.2
  Top Layer w0.2: v1(33.7,29.4) U4.AA9@34.2,29.9
  MidLayer3 w0.127: v1(33.7,29.4) 33.2,28.9 33.2,25.7 33.4,25.5 33.4,23.3 33.4,23 33.4,22.8 32.8,22.2 32.8,18.1 33.8,17.1 33.8,14.7 39.9,8.6 59.8,8.6 60.5,7.9 v2(60.5,7.1)
  Bottom Layer w0.2: v2(60.5,7.1) HDR_B1.81@60.5,8.6
DAU_TFT_M: HDR_B1.87 U4.AA12 | length 48.2
  Top Layer w0.2: v1(36.7,29.4) U4.AA12@37.2,29.9
  MidLayer3 w0.127: v1(36.7,29.4) 36.2,28.9 36.2,23.3 36.2,23 36.2,17.3 35.9,17 35.9,14.1 40.5,9.5 61.3,9.5 62.9,7.9 v2(62.9,7.1)
  Bottom Layer w0.2: v2(62.9,7.1) HDR_B1.87@62.9,8.6
DAU_TFT_MUX: HDR_B1.85 U4.AA11 | length 48.3
  Top Layer w0.2: v1(35.7,29.4) U4.AA11@36.2,29.9
  MidLayer3 w0.127: v1(35.7,29.4) 35.2,28.9 35.2,23.3 35.2,23 35.2,21.003 35.692,20.511 35.692,19.344 35.2,18.852 35.2,17.3 35.5,17 35.5,14 40.3,9.2 60.8,9.2 62.1,7.9 v2(62.1,7.1)
  Bottom Layer w0.2: v2(62.1,7.1) HDR_B1.85@62.1,8.6
DAU_TFT_POL: HDR_B1.83 U4.AA10 | length 48
  Top Layer w0.2: v1(34.7,29.4) U4.AA10@35.2,29.9
  MidLayer3 w0.127: v1(34.7,29.4) 34.2,28.9 34.2,23.3 34.2,23 34.2,18.437 34.7,17.937 34.7,17.4 34.4,17.1 34.4,14.6 40.1,8.9 60.3,8.9 61.3,7.9 v2(61.3,7.1)
  Bottom Layer w0.2: v2(61.3,7.1) HDR_B1.83@61.3,8.6
DAU_TFT_RED0: HDR_B1.52 U4.Y7 | length 33.3
  Top Layer w0.2: v1(31.7,30.4) U4.Y7@32.2,30.9
  MidLayer4 w0.127: v1(31.7,30.4) 31.2,29.9 31.2,23.3 31.2,23 31.2,19.7 34.5,16.4 48.2,16.4 48.5,16.7 v2(48.5,17.5)
  Bottom Layer w0.2: HDR_B1.52@48.5,15.4 v2(48.5,17.5)
DAU_TFT_RED1: HDR_B1.54 U4.Y8 | length 31.5
  Top Layer w0.2: v1(32.7,30.4) U4.Y8@33.2,30.9
  MidLayer4 w0.127: v1(32.7,30.4) 32.2,29.9 32.2,25.1 31.8,24.7 31.8,23.3 31.8,23 31.8,21 34.801,17.998 48.801,17.998 49.3,17.5 v2(49.3,16.9)
  Bottom Layer w0.2: HDR_B1.54@49.3,15.4 v2(49.3,16.9)
DAU_TFT_RED2: HDR_B1.56 U4.Y9 | length 32.1
  Top Layer w0.2: v1(33.7,30.4) U4.Y9@34.2,30.9
  MidLayer4 w0.127: v1(33.7,30.4) 33.2,29.9 33.2,25.4 32.2,24.4 32.2,23.3 32.2,23 32.2,21.2 32.999,20.401 37.799,20.401 39,19.2 39.9,18.3 49.3,18.3 v2(50.1,17.5)
  Bottom Layer w0.2: HDR_B1.56@50.1,15.4 v2(50.1,17.5)
DAU_TFT_RED3: HDR_B1.58 U4.Y10 | length 28.2
  Top Layer w0.2: v1(34.7,30.4) U4.Y10@35.2,30.9
  MidLayer4 w0.127: v1(34.7,30.4) 34.2,29.9 34.2,25.06 34.933,24.326 37.414,24.326 43.141,18.6 49.8,18.6 50.9,17.5 v2(50.9,16.9)
  Bottom Layer w0.2: HDR_B1.58@50.9,15.4 v2(50.9,16.9)
DAU_TFT_RED4: HDR_B1.60 U4.AF22 | length 11.4
  Top Layer w0.127: U4.AF22@47.2,24.9 47.2,23.3 47.2,23 47.2,22.4 51.7,17.9 v2(51.7,17.5)
  Bottom Layer w0.2: HDR_B1.60@51.7,15.4 v2(51.7,17.5)
DAU_TFT_STH: HDR_B1.86 U4.K7 | length 80.9
  Top Layer w0.2: v1(31.7,41.4) U4.K7@32.2,40.9
  MidLayer4 w0.127: v1(31.7,41.4) 31.2,41.9 27,41.9 26,42.9 24.6,42.9 24.3,42.9 22.3,42.9 21.2,41.8 21.2,20 28.1,13.1 58.3,13.1 v2(62.1,16.9)
  Bottom Layer w0.2: HDR_B1.86@62.1,15.4 v2(62.1,16.9)
DAU_TFT_STV: HDR_B1.84 U4.L7 | length 76.9
  Top Layer w0.2: v1(31.7,40.4) U4.L7@32.2,39.9
  MidLayer4 w0.127: v1(31.7,40.4) 31.3,40.9 27.4,40.9 24.6,40.9 24.3,40.9 21.6,38.2 21.6,20.1 28.3,13.4 57.8,13.4 61.3,16.9 v2(61.3,17.5)
  Bottom Layer w0.2: HDR_B1.84@61.3,15.4 v2(61.3,17.5)
DIP0: HDR_B1.22 U4.AD12 | length 11.8
  Top Layer w0.2: v1(36.7,26.4) U4.AD12@37.2,26.9
  MidLayer1 w0.127: v2(36.5,16.9) 36.5,17.6 36.7,17.8 36.7,23 36.7,23.3 v1(36.7,26.4)
  Bottom Layer w0.2: HDR_B1.22@36.5,15.4 v2(36.5,16.9)
DIP1: HDR_B1.24 U4.AC12 | length 13.1
  Top Layer w0.2: v1(36.7,27.4) U4.AC12@37.2,27.9
  MidLayer1 w0.127: v1(36.7,27.4) 37.2,26.9 37.2,23.3 37.2,23 37.2,21.9 37.3,21.8 v2(37.3,17.5) v2@37.2,17.6
  Bottom Layer w0.2: HDR_B1.24@37.3,15.4 v2(37.3,17.5)
DIP2: HDR_B1.26 U4.AD13 | length 11.9
  Top Layer w0.2: v1(37.7,26.4) U4.AD13@38.2,26.9
  MidLayer1 w0.127: v1(37.7,26.4) 37.7,23.3 37.7,23 37.7,18 38.1,17.6 v2(38.1,16.9)
  Bottom Layer w0.2: HDR_B1.26@38.1,15.4 v2(38.1,16.9)
DIP3: HDR_B1.28 U4.AF12 | length 10.2
  Top Layer w0.127: U4.AF12@37.2,24.9 37.2,24.2 37.9,23.5 37.9,22.8 37.9,22.5 37.9,18.559 38.9,17.559 v2(38.9,17.5)
  Bottom Layer w0.2: HDR_B1.28@38.9,15.4 v2(38.9,17.5)
DIP4: HDR_B1.30 U4.AC13 | length 13.9
  Top Layer w0.2: v1(37.7,27.4) U4.AC13@38.2,27.9
  MidLayer1 w0.127: v1(37.7,27.4) 38.2,26.9 38.2,26.1 38,25.9 38,23.3 38,23 38,19.8 38.5,19.3 38.916,19.3 39.3,18.916 39.3,18.6 39.7,18.2 v2(39.7,16.9)
  Bottom Layer w0.2: HDR_B1.30@39.7,15.4 v2(39.7,16.9)
DIP5: HDR_B1.32 U4.AC6 | length 28.9
  Top Layer w0.2: v1(30.7,27.4) U4.AC6@31.2,27.9
  MidLayer1 w0.127: v1(30.7,27.4) 30.2,26.9 30.2,25 29.9,24.7 29.9,23.3 29.9,23 29.9,19.2 28,17.3 28,16.6 28.9,15.7 39.7,15.7 40.5,16.5 v2(40.5,17.5)
  Bottom Layer w0.2: HDR_B1.32@40.5,15.4 v2(40.5,17.5)
DIP6: HDR_B1.34 U4.AC14 | length 13.8
  Top Layer w0.2: U4.AC14@39.2,27.9 v1(39.7,27.4)
  MidLayer1 w0.127: v1(39.7,27.4) 39.2,26.9 39.2,23.3 39.2,23 39.2,21.7 41.3,19.6 v2(41.3,16.9)
  Bottom Layer w0.2: HDR_B1.34@41.3,15.4 v2(41.3,16.9)
DIP7: HDR_B1.36 U4.AD14 | length 12.7
  Top Layer w0.2: U4.AD14@39.2,26.9 v1(39.7,26.4)
  MidLayer1 w0.127: v1(39.7,26.4) 39.7,23.3 39.7,23 39.7,21.9 42.1,19.5 v2(42.1,17.5)
  Bottom Layer w0.2: HDR_B1.36@42.1,15.4 v2(42.1,17.5)
DONE: R16.2 U4.H14 | length 18
  Top Layer w0.2: U4.H14@39.2,42.9 v1(39.7,43.4)
  Bottom Layer w0.127: v1(39.7,43.4) 39.2,43.9 39.2,44.7 39.4,44.9 50.8,44.9 51.7,44 51.7,42.1 51.938,41.862 R16.2@52.451,41.862 ; R16.2@52.451,41.9 R16.2@52.5,41.9